# EAGLE board voltage_divider (EAGLE 9.6.2)
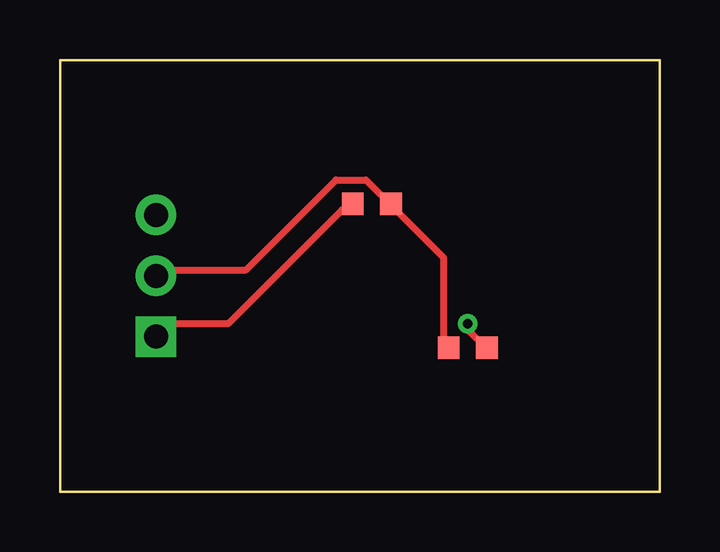
[diagram p0: board, top side]
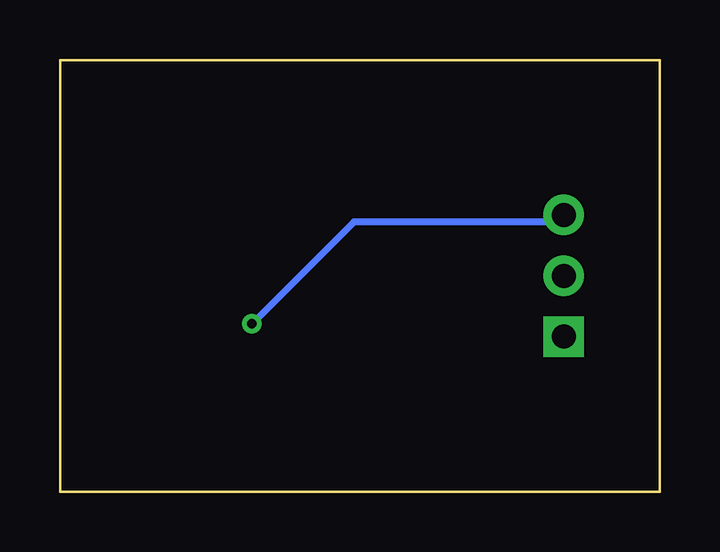
[diagram p1: board, bottom side, seen from below]

Size 25 x 18 mm. Coordinates in mm from the lower left corner, seen from the top.
Outline: 0,0 25,0 25,18 0,18 0,0
Copper layers used: Top, Bottom
Design rules "eh3d-kit": minimum track width 0.15mm, minimum drill 0.3mm, track to track 0.15mm, track to pad 0.15mm, pad to pad 0.15mm, via to via 0.15mm, smd to smd 0.15mm, copper to edge 0.3mm, drill to drill 0.25mm, minimum pad ring 0.15mm, minimum via ring 0.15mm

## Footprints (pad centres in the part's own frame; a part is rotated, then mirrored left to right if it is on the bottom)
HDR-1X03 = drill 1 pad 1.7 square: 1 -2.54,0 | drill 1 pad 1.7: 2 0,0; 3 2.54,0
CHIP-0603 = smd 0.9 x 0.95: 1 -0.8,0; 2 0.8,0

## Placement (x,y rotation side)
J1  SIG  [HDR-1X03]  4,9 90 top
R1  10k  [CHIP-0603]  13,12 0 top
R2  4k7  [CHIP-0603]  17,6 0 top

## Library data of the parts
J1 R1 R2 = eh3d-kit

## Nets
GND: J1.3 R2.2
TAP: J1.2 R1.2 R2.1
VIN: J1.1 R1.1

## Tracks (layer width: path | path; a pad name or v marks a point on that pad's centre or on a via)
GND  (via drill 0.4 pad 0.8)
  Top 0.3: v17,7 17,6.75 17.25,6.5 R2.2
  Bottom 0.3: J1.3 4.5,11.25 12.75,11.25 v17,7
TAP
  Top 0.3: R2.1 16,6.5 16,9.75 14.25,11.5 R1.2 13.25,12.5 12.75,13 11.5,13 7.75,9.25 4.5,9.25 J1.2
VIN
  Top 0.3: R1.1 11.75,11.75 7,7 4.5,7 J1.1